# Altium PCB data_logger.PcbDoc
Units mm, origin at the board's own origin, x right, y up, seen from the top; angles counter-clockwise.
Board outline 58 x 63 mm, 2 copper layers (Top Layer, Bottom Layer), stack 1.466 mm thick; 36 components, 27 nets, 137 pads, 4 vias.
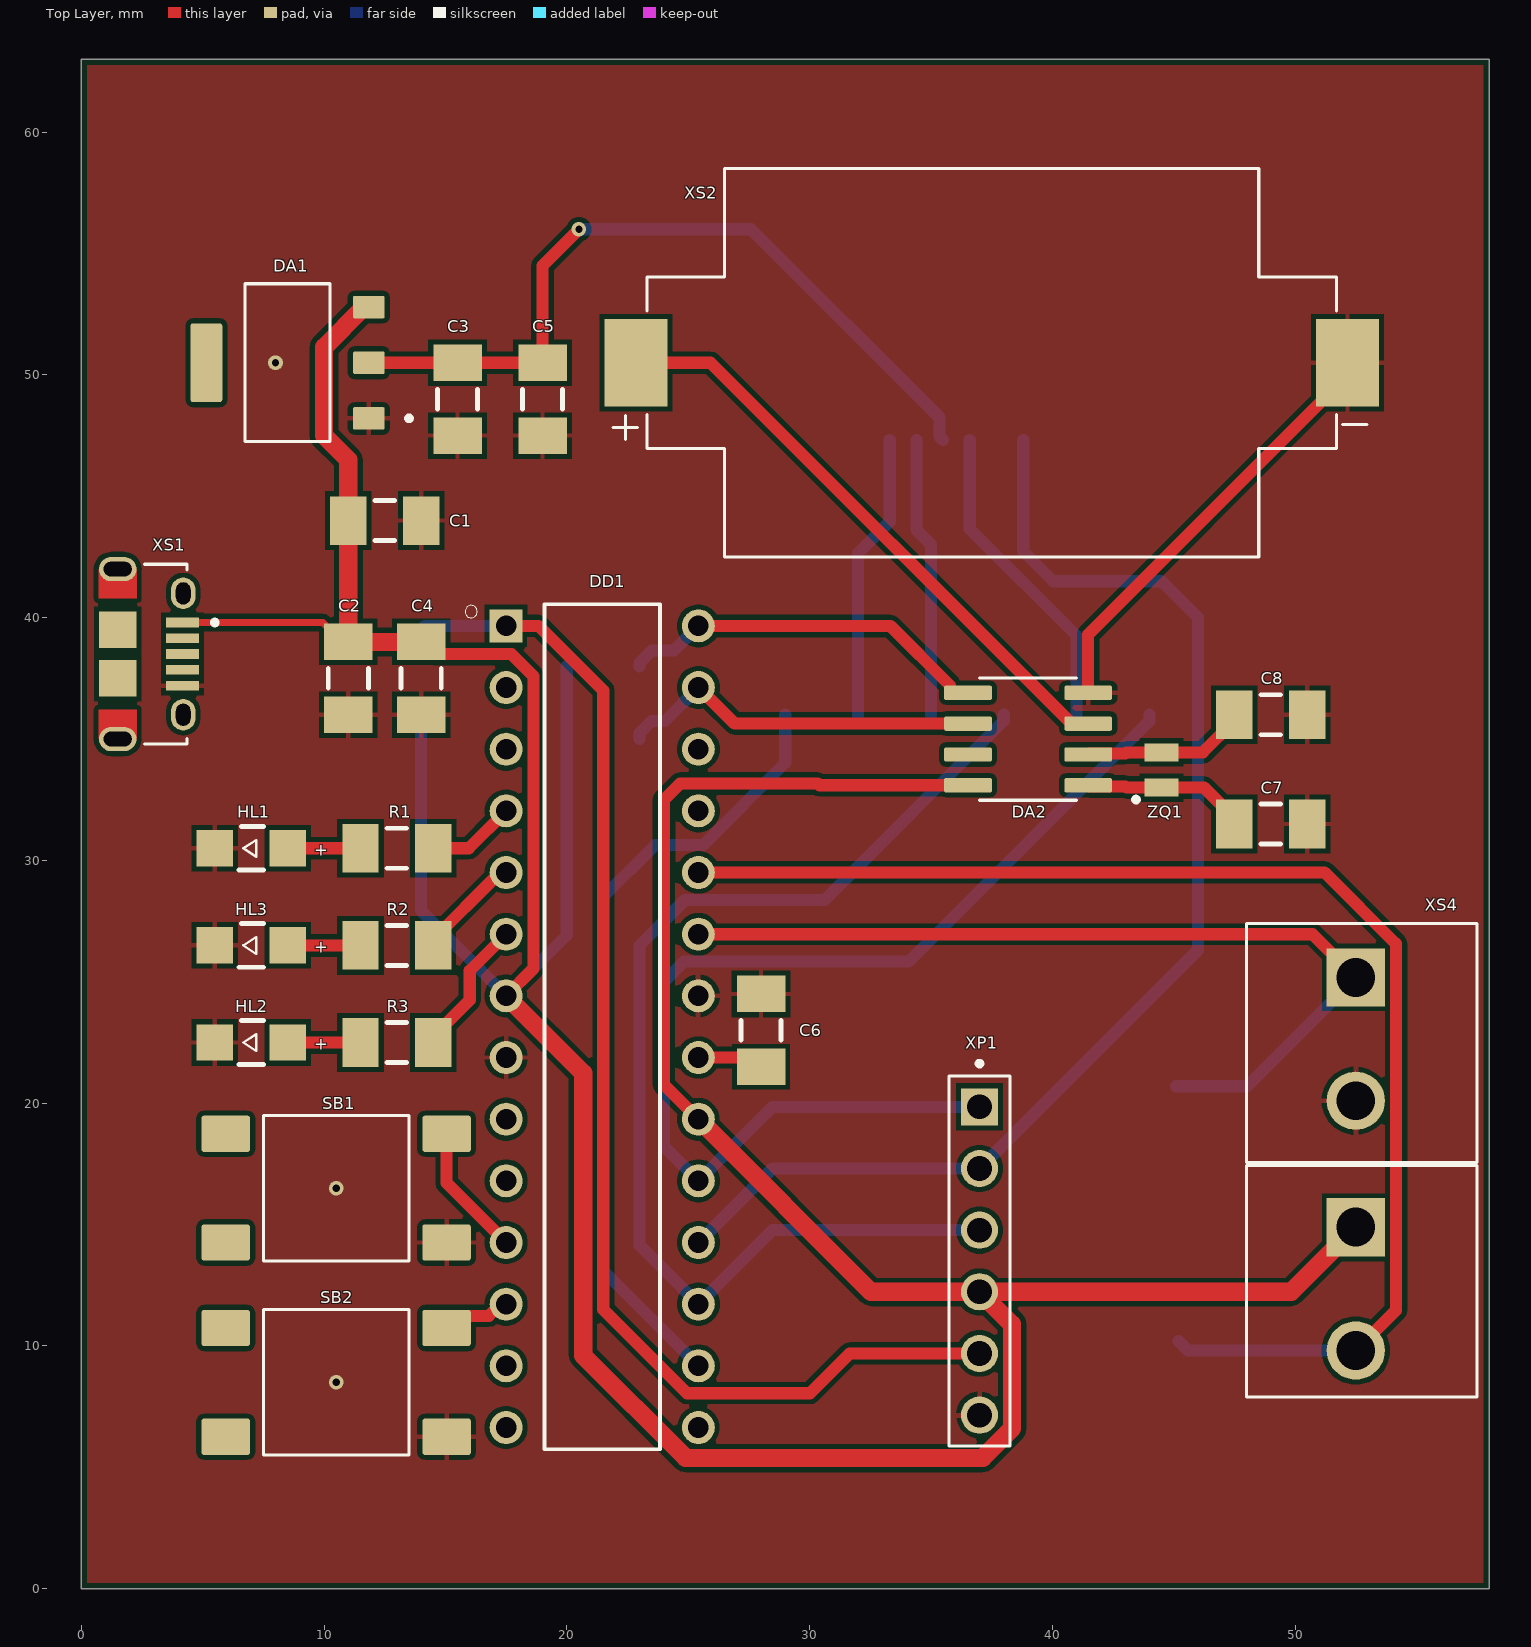
[diagram p0: Top Layer view]
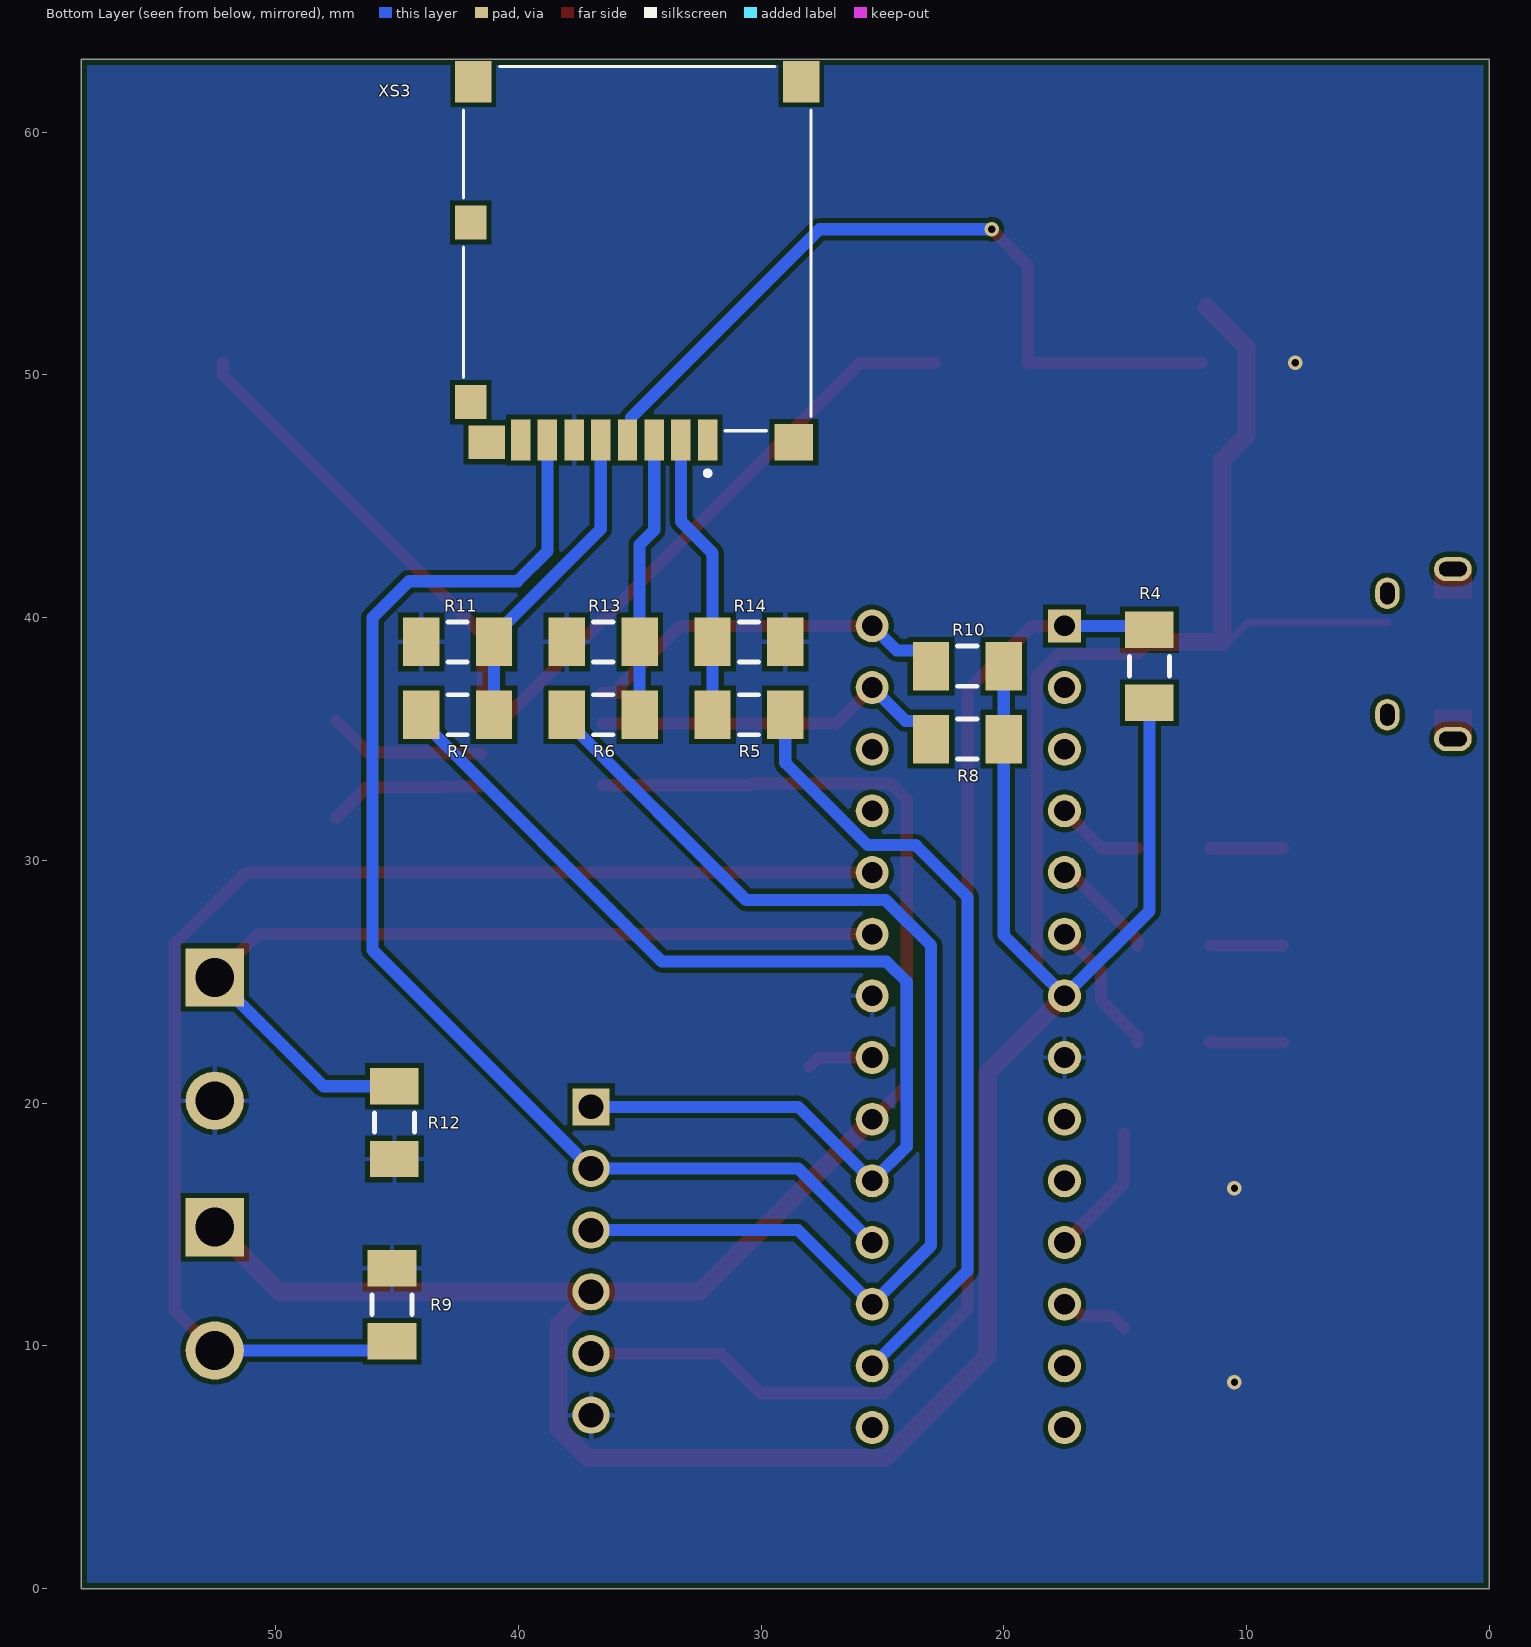
[diagram p1: Bottom Layer view, seen from below]

## Layer stack, top to bottom
Top Solder: solder mask 0.0102, Solder Resist, Dk 3.5
Top Layer: signal copper 0.018
Dielectric 1: core 1.43, FR4 Tg135, Dk 4.5
Bottom Layer: signal copper 0.018
Bottom Solder: solder mask 0.0102, Solder Resist, Dk 3.5

## Board outline
0,0 0,63 58,63 58,0

## Design rules (kind name [scope] priority, off if disabled: settings)
AcuteAngle [All] p1: minimum=3.50000000000000E+0001 checktracksonly=FALSE
BoardOutlineClearance "BoardOutlineClearance 1" [All] p1: gap=0.25 ignorepadtopadclearanceinfootprint=FALSE except(0: Arc-SplitContinuation Track-SplitContinuation SMDPad-SplitContinuation THPad-SplitContinuation Via-SplitContinuation Fill-SplitContinuation Poly-SplitContinuation Region-SplitContinuation Text-SplitContinuation) // Milling
BoardOutlineClearance "BoardOutlineClearance 2" [All] p2: gap=0.4 ignorepadtopadclearanceinfootprint=FALSE except(0: Arc-SplitContinuation Track-SplitContinuation SMDPad-SplitContinuation THPad-SplitContinuation Via-SplitContinuation Fill-SplitContinuation Poly-SplitContinuation Region-SplitContinuation Text-SplitContinuation) // V-Cut
Clearance "Clearance-1 1 Oz" [All] p1: gap=0.2 ignorepadtopadclearanceinfootprint=FALSE except(0.25: Arc-Hole Track-Hole SMDPad-Hole THPad-Hole Via-Hole Fill-Hole Poly-Hole Region-Hole Text-Hole) // Standart
DiffPairsRouting "DiffPairsRouting 1 Oz" [All] p1: maxlimit=0.254 minlimit=0.2 mostfreqgap=0.254 toplayer_minwidth=0.2 toplayer_maxwidth=0.381 toplayer_prefwidth=0.381 bottomlayer_minwidth=0.2 bottomlayer_maxwidth=0.381 bottomlayer_prefwidth=0.381 maxuncoupledlength=12.7
HoleSize "Minimum HoleSize" [IsPad] p1: absolutevalues=TRUE maxlimit=5.9 minlimit=0.6 maxpercent=80.000 minpercent=20.000
HoleSize "Minimum HoleSize VIA 1" [IsVia] p2: absolutevalues=TRUE maxlimit=5.9 minlimit=0.3 maxpercent=80.000 minpercent=20.000 // Standart
HoleSize "Minimum HoleSize VIA 2" [IsVia] p3: absolutevalues=TRUE maxlimit=5.9 minlimit=0.2 maxpercent=80.000 minpercent=20.000 // Advance
HoleToHoleClearance Hole2HoleClearance [All] p1: gap=0.25 allowstackedmicrovias=FALSE
MinimumAnnularRing "Minimum AR VIA Standart" [IsVia] p1: minimumring=0.15
MinimumAnnularRing "Minimum AR PAD Standart" [IsPAD] p2: minimumring=0.2
MinimumAnnularRing "Minimum AR VIA Advance" [IsVia] p3: minimumring=0.1
MinimumAnnularRing "Minimum AR PAD Advance" [IsPAD] p4: minimumring=0.15
MinimumSolderMaskSliver "SolderMask Bridge Standart" [All] p1: minsoldermaskwidth=0.15 // All Masks
MinimumSolderMaskSliver "SolderMask Bridge Advance" [All] p2: minsoldermaskwidth=0.1 // Mask LDI
PlaneClearance "PlaneClearance 1 Oz" [All] p1: clearance=0.2
PlaneConnect "TermalConnect-1 1 Oz" [All] p1: planeconnectstyle=Relief reliefexpansion=0.2 reliefentries=4 reliefconductorwidth=0.2 reliefairgap=0.2 // Standart
PlaneConnect "TermalConnect-1 1/2 Oz" [All] p2: planeconnectstyle=Relief reliefexpansion=0.2 reliefentries=4 reliefconductorwidth=0.2 reliefairgap=0.2 // Standart
PolygonConnect "PolygonConnect-1 1 Oz" [All] p1: thpad.connectstyle=Relief thpad.reliefconductorwidth=0.2 thpad.reliefentries=4 thpad.polygonreliefangle="90 Angle" thpad.airgapwidth=0.2 smdpad.connectstyle=Relief smdpad.reliefconductorwidth=0.2 smdpad.reliefentries=4 smdpad.polygonreliefangle="90 Angle" smdpad.airgapwidth=0.2 via.connectstyle=Direct via.reliefconductorwidth=0.254 via.reliefentries=4 via.polygonreliefangle="90 Angle" via.airgapwidth=0.254 // Standart
RoutingCorners [All] p1 off: cornerstyle=45-Degree minsetback=2.54 maxsetback=2.54
RoutingVias [All] p1: holewidth=0.3 width=0.6 viastyle="Through Hole" minholewidth=0.2 minwidth=0.4 maxholewidth=5.9 maxwidth=6.4
SilkToSilkClearance Silk2SilkClearance [All] p1 off: silktosilkclearance=0.15
SilkToSolderMaskClearance Silk2SolderMaskClearance [IsPad] p1 off: minsilkscreentomaskgap=0.15 clearancetoexposedcopper=TRUE
SolderMaskExpansion SolderMaskExpansion-1 [All] p1: expansion=0.05 istentingtop=FALSE // Standart
SolderMaskExpansion "SolderMaskExpansion LDI" [All] p2: expansion=0.025 istentingtop=FALSE // Advance
SupplyNets "Schematic Supply Nets_2" [InNet('+3,3V')] p1: voltage=0.000
SupplyNets "Schematic Supply Nets_1" [InNet('GND')] p2: voltage=0.000
SupplyNets "Schematic Supply Nets" [InNet('+5V')] p3: voltage=0.000
UnRoutedNet [All] p1: checkbadconnections=TRUE
Width "Width 1 Oz" [All] p1: maxlimit=10 minlimit=0.15 preferedwidth=0.2 checkconnectedcopper=TRUE
20 further rules are at their usual default settings.

## Components (designator, comment, footprint, x,y, rotation, side; value= is the part's Value field where it differs from the comment)
C1 "cap" SMDcap 12.5,44 r180 top
C2 "cap" SMDcap 11,37.5 r90 top
C3 "cap" SMDcap 15.5,49 r90 top
C4 "cap" SMDcap 14,37.5 r90 top
C5 "cap" SMDcap 19,49 r90 top
C6 "cap" SMDcap 28,23 r90 top
C7 "cap" SMDcap 49,31.5 r180 top
C8 "cap" SMDcap 49,36 r180 top
DA1 "AMS1117-3.3" stab 8.5,50.5 r180 top
DA2 "DS1307N" realt 39,35 r180 top
DD1 "ATmega328P-PU" ATmega328P-PU 21.46,23.15 r0 top
HL1 "HL?" SMDLED 7,30.5 r0 top
HL2 "HL?" SMDLED 7,22.5 r0 top
HL3 "HL?" SMDLED 7,26.5 r0 top
R1 "510 Ом" SMDRES 13,30.5 r180 top
R2 "" SMDRES 13,26.5 r180 top
R3 "" SMDRES 13,22.5 r180 top
R4 "" SMDRES 14,38 r270 bottom
R5 "" SMDRES 30.5,36 r180 bottom
R6 "" SMDRES 36.5,36 r0 bottom
R7 "" SMDRES 42.5,36 r180 bottom
R8 "" SMDRES 21.5,35 r0 bottom
R9 "" SMDRES 45.2,11.7 r270 bottom
R10 "" SMDRES 21.5,38 r0 bottom
R11 "" SMDRES 42.5,39 r180 bottom
R12 "" SMDRES 45.1,19.2 r90 bottom
R13 "" SMDRES 36.5,39 r180 bottom
R14 "" SMDRES 30.5,39 r0 bottom
SB1 "knopka" smdknop 10.5,16.5 r180 top
SB2 "knopka" smdknop 10.5,8.5 r180 top
XP1 "prog" prog 37,13.5 r270 top
XS1 "pit" "pit usb" 1.5,38.5 r270 top
XS2 "batter" BAT 37.5,50.5 r0 top
XS3 "SD" SDcard 35.1,54.7 r0 bottom
XS4 "out" dat 52.5,14.893 r270 top
ZQ1 "qwartz" smdqwartz 44.5,33.725 r90 top

## Footprints (in the part's own frame and the unit in brackets; to place one, negate y for a bottom-side part, rotate by r counter-clockwise, add the part's x,y. Pads: shape width x height; smd on the part's side, far side on the other; paste and mask are expansions set on the pad)
ATmega328P-PU [mm]
  rect 1.358x1.358 hole 0.85: 1(-3.96,16.51)
  round 1.358 hole 0.85: 2(-3.96,13.97) 3(-3.96,11.43) 4(-3.96,8.89) 5(-3.96,6.35) 6(-3.96,3.81) 7(-3.96,1.27) 8(-3.96,-1.27) 9(-3.96,-3.81) 10(-3.96,-6.35) 11(-3.96,-8.89) 12(-3.96,-11.43) 13(-3.96,-13.97) 14(-3.96,-16.51) 15(3.96,-16.51) 16(3.96,-13.97) 17(3.96,-11.43) 18(3.96,-8.89) 19(3.96,-6.35) 20(3.96,-3.81) 21(3.96,-1.27) 22(3.96,1.27) 23(3.96,3.81) 24(3.96,6.35) 25(3.96,8.89) 26(3.96,11.43) 27(3.96,13.97) 28(3.96,16.51)
  silkscreen extent -5.65,-17.4 2.38,17.4, body extent -3.95,-17.46 3.95,17.21, height 4.57
BAT [mm]
  rect 2.59x3.61 smd: N(14.655,0) P(-14.655,0)
  silkscreen extent -15.59,-8 15.46,8, body extent -15.92,-7.94 15.91,8.06, height 5.58
dat [mm]
  rect 2.4x2.4 / inner round 2.4 / far side rect 2.4x2.4 hole 1.6: 1(-10.287,0) vcc(0,0)
  round 2.4 hole 1.6: 2(5.08,0) gnd(-5.207,0)
  silkscreen extent -12.5,-4.5 7,5, body extent -13.43,-5.08 7.49,5.25, height 14
"pit usb" [mm]
  rect 0.4x1.35 smd: 1(-1.3,2.675) 2(-0.65,2.675) 3(0,2.675) 4(0.65,2.675) 5(1.3,2.675)
  oval 1x1.55 hole 0.6 slot 1.15 at 90 deg mask+0: SH1(-3.5,0) SH4(3.5,0)
  rect 1.5x1.55 smd: SH2(1,0) SH3(-1,0)
  oval 1.3x1 hole 0.6 slot 0.9 at 0 deg: SH5(-2.5,2.7) SH6(2.5,2.7)
  Top Layer region: -2.3,-0.775 -3.445,-0.775 -3.471,-0.774 -3.497,-0.772 -3.523,-0.769 -3.549,-0.764 -3.574,-0.758 -3.6,-0.751 -3.624,-0.742 -3.648,-0.732 -3.672,-0.721 -3.695,-0.708 -3.717,-0.694 -3.739,-0.68 -3.76,-0.664 -3.78,-0.647 -3.799,-0.629 -3.817,-0.61 -3.834,-0.59 -3.85,-0.569 -3.864,-0.547 -3.878,-0.525 -3.891,-0.502 -3.902,-0.478 -3.912,-0.454 -3.921,-0.43 -3.928,-0.404 -3.934,-0.379 -3.939,-0.353 -3.942,-0.327 -3.944,-0.301 -3.945,-0.275 -3.945,0.275 -3.944,0.301 -3.942,0.327 -3.939,0.353 -3.934,0.379 -3.928,0.404 -3.921,0.43 -3.912,0.454 -3.902,0.478 -3.891,0.502 -3.878,0.525 -3.864,0.547 -3.85,0.569 -3.834,0.59 -3.817,0.61 -3.799,0.629 -3.78,0.647 -3.76,0.664 -3.739,0.68 -3.717,0.694 -3.695,0.708 -3.672,0.721 -3.648,0.732 -3.624,0.742 -3.6,0.751 -3.574,0.758 -3.549,0.764 -3.523,0.769 -3.497,0.772 -3.471,0.774 -3.445,0.775 -2.3,0.775
  Top Layer region: 3.471,0.774 3.497,0.772 3.523,0.769 3.549,0.764 3.574,0.758 3.6,0.751 3.624,0.742 3.648,0.732 3.672,0.721 3.695,0.708 3.717,0.694 3.739,0.68 3.76,0.664 3.78,0.647 3.799,0.629 3.817,0.61 3.834,0.59 3.85,0.569 3.864,0.547 3.878,0.525 3.891,0.502 3.902,0.478 3.912,0.454 3.921,0.43 3.928,0.404 3.934,0.379 3.939,0.353 3.942,0.327 3.944,0.301 3.945,0.275 3.945,-0.275 3.944,-0.301 3.942,-0.327 3.939,-0.353 3.934,-0.379 3.928,-0.404 3.921,-0.43 3.912,-0.454 3.902,-0.478 3.891,-0.502 3.878,-0.525 3.864,-0.547 3.85,-0.569 3.834,-0.59 3.817,-0.61 3.799,-0.629 3.78,-0.647 3.76,-0.664 3.739,-0.68 3.717,-0.694 3.695,-0.708 3.672,-0.721 3.648,-0.732 3.624,-0.742 3.6,-0.751 3.574,-0.758 3.549,-0.764 3.523,-0.769 3.497,-0.772 3.471,-0.774 3.445,-0.775 2.3,-0.775 2.3,0.775 3.445,0.775
  silkscreen extent -3.7,1.1 3.7,4.1, body extent -4.02,-2.68 4.02,2.85, height 2.67
prog [mm]
  rect 1.53x1.53 / inner round 1.53 / far side rect 1.53x1.53 hole 1.02 mask+0.102: 1(-6.35,0)
  round 1.53 hole 1.02 mask+0.102: 2(-3.81,0) 3(-1.27,0) 4(1.27,0) 5(3.81,0) 6(6.35,0)
  silkscreen extent -8.23,-1.25 7.62,1.25, body extent -7.62,-1.25 7.62,1.25, height 8.6
realt [mm]
  rrect25% 1.97x0.59 smd: 1(-2.475,1.905) 2(-2.475,0.635) 3(-2.475,-0.635) 4(-2.475,-1.905) 5(2.475,-1.905) 6(2.475,-0.635) 7(2.475,0.635) 8(2.475,1.905)
  silkscreen extent -4.54,-2.52 2,2.59, body extent -3,-2.45 3,2.45, height 1.75
SDcard [mm]
  rect 0.8x1.68 smd: 1(-2.9,7.385) 2(-1.8,7.385) 3(-0.7,7.385) 4(0.4,7.385) 5(1.5,7.385) 6(2.6,7.385) 7(3.7,7.385) 8(4.8,7.385)
  rect 1.29x1.4 smd: DN(6.855,5.825) SN(6.855,-1.575)
  rect 1.5x1.7 smd: SH1(-6.75,-7.375) SH2(6.75,-7.375)
  rect 1.5x1.4 smd mask+0.045: SH3(6.2,7.475)
  rect 1.6x1.5 smd: SH4(-6.45,7.475)
  silkscreen extent -7.15,-8 7.15,8.85, body extent -7.17,-8.15 7.13,7.85, height 2.13
SMDcap [mm] "Chip Resistor, 2-Leads, Body 3,20x1,60mm, IPC Low Density"
  rect 1.5x2 smd: 1(-1.5,0) 2(1.5,0)
  silkscreen extent -0.4,-0.82 0.4,0.82, body extent -1.7,-0.87 1.7,0.87, height 0.8
smdknop [mm]
  rrect15% 2x1.5 smd: 1(-4.55,2.24) 2(-4.55,-2.24) 3(4.55,2.24) 4(4.55,-2.24)
  silkscreen extent -3,-3 3,3, body extent -5,-3 5,3, height 5.07
SMDLED [mm]
  rect 1.5x1.5 smd: A(1.5,0) C(-1.5,0)
  silkscreen extent -0.5,-0.9 0.5,0.9, body extent -1.6,-0.8 1.6,0.8, height 0.68
smdqwartz [mm]
  rect 0.75x1.4 smd: 1(-0.725,0) 2(0.725,0)
  body extent -1,-0.6 1,0.6, height 0.61
SMDRES [mm] "Chip Resistor, 2-Leads, Body 3,20x1,60mm, IPC Low Density"
  rect 1.5x2 smd: 1(-1.5,0) 2(1.5,0)
  silkscreen extent -0.4,-0.82 0.4,0.82, body extent -1.7,-0.87 1.7,0.87, height 0.8
stab [mm]
  rrect15% 1.31x0.93 smd: 1(-3.345,2.29) 2(-3.345,0) 3(-3.345,-2.29)
  rrect15% 1.31x3.24 smd: 4(3.345,0)
  silkscreen extent -5.1,-3.25 1.75,3.25, body extent -3.5,-3.25 3.5,3.25, height 1.8

## Part data
DA1: library part stab
DA2: library part DS3231MZ
R1 R2 R3 R4 R5 R6 R7 R8 R9 R10 R11 R12 R13 R14: library part res

## Via types
v1: diameter 0.6, hole 0.3, Top Layer to Bottom Layer, 4 vias

## Nets (pads, with @x,y where several pads share a name; then routed paths per layer and width w, separated by ;. In a path a pad name is that pad's centre, name@x,y a point inside that pad or via, vN(x,y) a via of type N, cw(c..) or ccw(c..) an arc to the next point about the centre after c; other vN are vias at no path point)
+3,3V: C3.2 C5.2 DA1.2 XS3.4 | length 32.3
  Top Layer w0.5: DA1.2 C3.2 C5.2 19,54.5 v1(20.5,56)
  Bottom Layer w0.5: v1(20.5,56) 27.591,56 35.35,48.241 35.35,47.465 XS3.4
+5V: C1.2 C2.2 C4.2 DA1.3 DA2.8 DD1.7 DD1.20 R4.2 R8.1 R10.1 XP1.4 XS1.1 XS4.vcc | length 172
  Top Layer w0.3: XS1.1 9.95,39.8 10.75,39 C2.2
  Top Layer w0.5: C4.2 14.5,38.5 17.717,38.5 18.629,37.588 18.629,25.549 DD1.7 ; DD1.20 24,20.76 24,32.5 24.669,33.169 30.334,33.169 30.408,33.095 DA2.8
  Top Layer w0.75: DA1.3@11.655,52.79 10,51.135 10,47.5 11,46.5 C1.2 C2.2 C4.2 ; DD1.7 20.675,21.245 20.675,9.612 24.901,5.386 37.131,5.386 38.34,6.595 38.34,10.89 XP1.4 ; DD1.20 32.53,12.23 XP1.4 ; XS4.vcc 49.837,12.23 XP1.4
  Bottom Layer w0.5: R4.2 14,27.92 DD1.7 20,26.92 R8.1 R10.1
GND: C1.1 C2.1 C3.1 C4.1 C5.1 C6.2 C7.1 C8.1 DA1.1 DA2.4 DD1.8 DD1.22 HL1.C HL2.C HL3.C R9.1 R11.1 R12.1 R13.1 R14.1 SB1.1 SB2.1 XP1.6 XS1.5 XS2.N XS3.6 XS4.gnd | length 18
  Top Layer w0.5: DA2.4 41.475,39.31 52.155,49.99 XS2.N
  other v1: 10.5,8.5 10.5,16.5 8,50.5
MISO: DD1.18 XP1.2 XS3.7 | length 52.2
  Bottom Layer w0.5: DD1.18 28.47,17.31 XP1.2 46,26.31 46,40 44.5,41.5 40.039,41.5 38.8,42.739 XS3.7
MOSI: DD1.17 R6.2 XP1.3 | length 47.7
  Bottom Layer w0.5: XP1.3 28.47,14.77 DD1.17 23,14.14 23,26.5 24.871,28.371 30.621,28.371 38,35.75 R6.2
NetC6_1: C6.1 DD1.21 | length 2.7
  Top Layer w0.5: DD1.21 27.62,21.88 C6.1
NetC7_2: C7.2 DA2.1 ZQ1.1 | length 6.4
  Top Layer w0.5: DA2.1@41.52,33.05 43,33.05 ; 43.05,33 ZQ1.1 46.25,33 C7.2@47.5,31.75
NetC8_2: C8.2 DA2.2 ZQ1.2 | length 6.5
  Top Layer w0.5: DA2.2@41.52,34.41 43.01,34.41 ; 43.05,34.45 ZQ1.2 46.2,34.45 C8.2@47.5,35.75
NetDA2_3: DA2.3 XS2.P | length 24.8
  Top Layer w0.5: XS2.P 25.92,50.5 40.785,35.635 DA2.3
NetDA2_5: DA2.5 DD1.28 R10.2 | length 15.6
  Top Layer w0.5: DD1.28 33.33,39.66 35.79,37.2 35.79,36.95 35.835,36.905 DA2.5
  Bottom Layer w0.5: R10.2 23,38.15 23.5,38.65 24.41,38.65 DD1.28
NetDA2_6: DA2.6 DD1.27 R8.2 | length 15.2
  Top Layer w0.5: DD1.27 26.905,35.635 DA2.6
  Bottom Layer w0.5: R8.2 23,35.25 23.5,35.75 24.05,35.75 DD1.27
NetDD1_4: DD1.4 R1.1 | length 3.6
  Top Layer w0.5: R1.1 15.96,30.5 DD1.4
NetDD1_5: DD1.5 R2.1 | length 4.4
  Top Layer w0.5: R2.1 14.5,26.75 17.086,29.336 17.336,29.336 DD1.5
NetDD1_6: DD1.6 R3.1 | length 5.7
  Top Layer w0.5: R3.1 14.5,22.75 16,24.25 16,25.46 DD1.6
NetDD1_11: DD1.11 SB1.2 | length 5.5
  Top Layer w0.5: SB1.2 15.05,16.71 DD1.11
NetDD1_12: DD1.12 SB2.2 | length 2.9
  Top Layer w0.5: SB2.2 15.55,11.24 16.788,11.24 17.268,11.72 DD1.12
NetDD1_16: DD1.16 R5.2 | length 32.7
  Bottom Layer w0.5: DD1.16 21.5,13.1 21.5,28.5 23.629,30.629 25.606,30.629 29,34.023 R5.2
NetDD1_23: DD1.23 R12.2 XS4.1 | length 37.1
  Top Layer w0.5: DD1.23 50.72,26.96 XS4.1
  Bottom Layer w0.5: R12.2 48.02,20.7 XS4.1
NetDD1_24: DD1.24 R9.2 XS4.2 | length 54.8
  Top Layer w0.5: DD1.24 51.216,29.5 54.15,26.566 54.15,11.463 XS4.2
  Bottom Layer w0.5: R9.2 45.587,9.813 XS4.2
NetHL1_A: HL1.A R1.2 | length 3
  Top Layer w0.5: HL1.A R1.2
NetHL2_A: HL2.A R3.2 | length 3
  Top Layer w0.5: HL2.A R3.2
NetHL3_A: HL3.A R2.2 | length 3
  Top Layer w0.5: HL3.A R2.2
NetR5_1: R5.1 R14.2 XS3.2 | length 11.9
  Bottom Layer w0.5: R5.1 R14.2 32,42.663 33.3,43.963 XS3.2
NetR6_1: R6.1 R13.2 XS3.3 | length 11.6
  Bottom Layer w0.5: XS3.3 34.4,43.613 35,43.012 R13.2 R6.1
NetR7_2: R7.2 R11.2 XS3.5 | length 13.1
  Bottom Layer w0.5: XS3.5 36.6,43.65 41,39.25 R11.2 R7.2
RESET: DD1.1 R4.1 XP1.5 | length 51.8
  Top Layer w0.5: DD1.1 18.84,39.66 21.5,37 21.5,11.503 24.952,8.051 30.017,8.051 31.656,9.69 XP1.5
  Bottom Layer w0.5: R4.1 14.16,39.66 DD1.1
SCK: DD1.19 R7.1 XP1.1 | length 46.3
  Bottom Layer w0.5: XP1.1 28.47,19.85 DD1.19 24,18.22 24,25 24.831,25.831 34.081,25.831 44,35.75 R7.1
pads on no net: DA1.4 DA2.7 DD1.2 DD1.3 DD1.9 DD1.10 DD1.13 DD1.14 DD1.15 DD1.25 DD1.26 SB1.3 SB1.4 SB2.3 SB2.4 XS1.2 XS1.3 XS1.4 XS1.SH1 XS1.SH2 XS1.SH3 XS1.SH4 XS1.SH5 XS1.SH6 XS3.1 XS3.8 XS3.DN XS3.SH1 XS3.SH2 XS3.SH3 XS3.SH4 XS3.SN

## Polygon pours and split planes (outlines as drawn)
GND on Bottom Layer "GND_L02_P000" (solid, pour order 0): 0,0 0,63 58,63 58,0
GND on Top Layer "GND_L01_P002" (solid, pour order 2): 0,0 0,63 58,63 58,0

## Text inside footprints (layer, text, board x,y; h text height)
HL1: Top Overlay "+" at 9.6,30.2 h0.5; Top Assembly "+" at 9.6,30.2 h0.5
HL2: Top Overlay "+" at 9.6,22.2 h0.5; Top Assembly "+" at 9.6,22.2 h0.5
HL3: Top Overlay "+" at 9.6,26.2 h0.5; Top Assembly "+" at 9.6,26.2 h0.5
XS1: Mechanical 13 "PCB EDGE" at 0.25,34.25 h0.81 r270